# Altium PCB 5PB1214CMGK8.pcbdoc
Units mm, origin at the board's own origin, x right, y up, seen from the top; angles counter-clockwise.
Board outline 16.1 x 15.8 mm, 2 copper layers (Top Layer, Bottom Layer), stack 0 mm thick; 1 components, 0 nets, 16 pads, 0 vias.
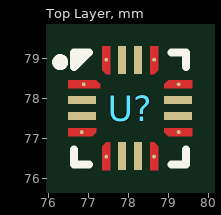
[diagram p0: Top Layer view]
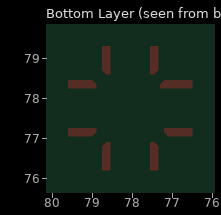
[diagram p1: Bottom Layer view, seen from below]

## Layer stack, top to bottom
Top Layer: signal copper (thickness not stored)
Bottom Layer: signal copper (thickness not stored)

## Board outline
85.95,69.85 69.85,69.85 69.85,85.65 85.95,85.65

## Design rules (kind name [scope] priority, off if disabled: settings)
PasteMaskExpansion "Paste Mask Expansion" [All] p1: expansion=0
SolderMaskExpansion "Solder Mask Expansion" [IsVia] p1: expansion=-25.4 istentingtop=TRUE
SolderMaskExpansion "Solder Mask Expansion" [All] p2: expansion=0.051 istentingtop=FALSE

## Components (designator, comment, footprint, x,y, rotation, side; value= is the part's Value field where it differs from the comment)
U? "5PB1214CMGK8" QFN-16_L2.5-W2.5-P0.40-TL-A 78.05,77.75 r0 top

## Footprints (in the part's own frame and the unit in brackets; to place one, negate y for a bottom-side part, rotate by r counter-clockwise, add the part's x,y. Pads: shape width x height; smd on the part's side, far side on the other; paste and mask are expansions set on the pad)
QFN-16_L2.5-W2.5-P0.40-TL-A [mm]
  round 0.098 smd: 1(-1.162,0.598) 4(-1.212,-0.598) 5(-0.598,-1.212) 8(0.598,-1.212) 9(1.212,-0.598) 12(1.212,0.598) 13(0.598,1.212) 16(-0.598,1.212)
  rect 0.7x0.2 smd: 2(-1.2,0.2) 3(-1.2,-0.2) 10(1.2,-0.2) 11(1.2,0.2)
  rect 0.2x0.7 smd: 6(-0.2,-1.2) 7(0.2,-1.2) 14(0.2,1.2) 15(-0.2,1.2)
  Top Layer region: 0.85,0.5 0.85,0.6 0.95,0.7 1.55,0.7 1.55,0.5
  Top Layer region: 0.85,-0.5 1.55,-0.5 1.55,-0.7 1.05,-0.7 0.95,-0.7 0.85,-0.6
  Top Layer region: -0.85,-0.5 -0.85,-0.6 -0.95,-0.7 -1.55,-0.7 -1.55,-0.5
  Top Layer region: -0.75,0.5 -1.55,0.5 -1.55,0.7 -1.05,0.7 -0.85,0.7 -0.75,0.6
  Top Layer region: 0.5,1.55 0.5,0.9 0.5,0.85 0.6,0.85 0.7,0.95 0.7,1.55
  Top Layer region: -0.5,-1.55 -0.5,-0.9 -0.5,-0.85 -0.6,-0.85 -0.7,-0.95 -0.7,-1.55
  Top Layer region: -0.5,1.55 -0.5,0.9 -0.5,0.85 -0.6,0.85 -0.7,0.95 -0.7,1.55
  Top Layer region: 0.5,-1.55 0.5,-0.9 0.5,-0.85 0.6,-0.85 0.7,-0.95 0.7,-1.55
  silkscreen extent -1.85,-1.4 1.4,1.4

## Nets (pads, with @x,y where several pads share a name; then routed paths per layer and width w, separated by ;. In a path a pad name is that pad's centre, name@x,y a point inside that pad or via, vN(x,y) a via of type N, cw(c..) or ccw(c..) an arc to the next point about the centre after c; other vN are vias at no path point)
pads on no net: U?.1 U?.2 U?.3 U?.4 U?.5 U?.6 U?.7 U?.8 U?.9 U?.10 U?.11 U?.12 U?.13 U?.14 U?.15 U?.16